# Altium PCB Urukul.PcbDoc (part 11 of 15)
Units mm, origin at the board's own origin, x right, y up, seen from the top; angles counter-clockwise.
Board outline 161.99 x 100 mm, 6 copper layers (L1, L2, L3, L4, P5, L6), stack 1.548 mm thick; 1078 components, 609 nets, 3798 pads, 2552 vias.
Unrouted connection lines stored in the file: 1.
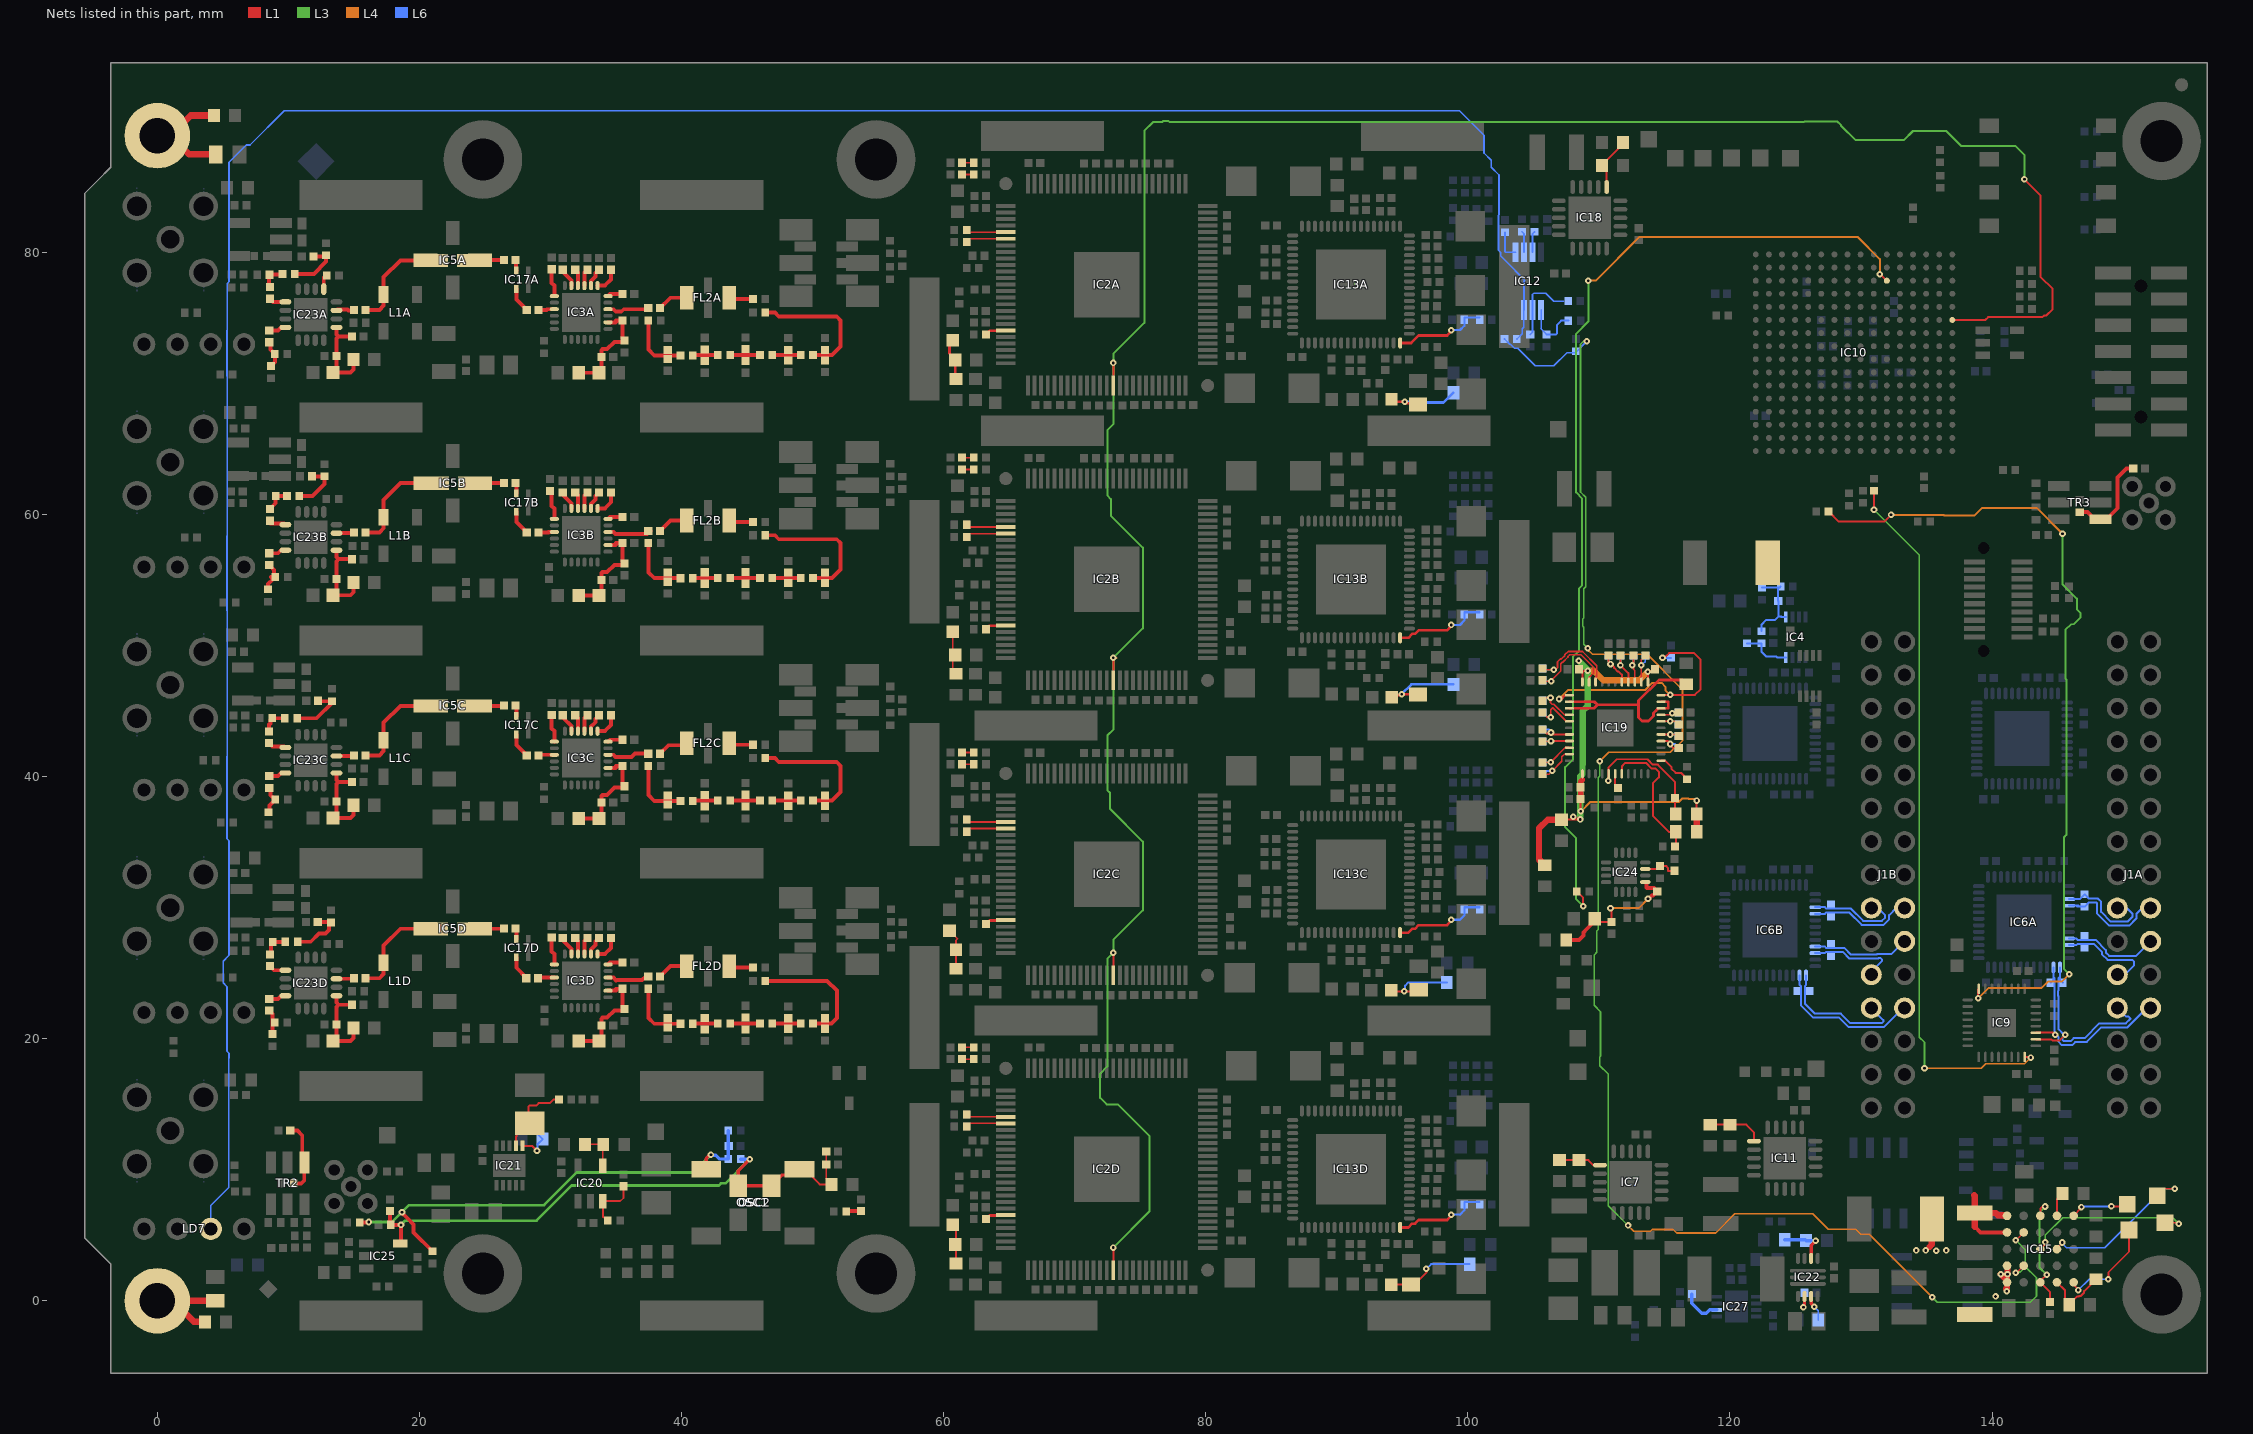
[diagram p13: the nets of this part, all layers, seen from the top]

## Via types
v1: diameter 0.5, hole 0.2, L1 to L6, tented both sides, 1964 vias
v2: diameter 0.5, hole 0.2, L1 to L6, 480 vias
v3: diameter 0.6, hole 0.3, L1 to L6, tented both sides, 52 vias
v4: diameter 0.6, hole 0.3, L1 to L6, 36 vias
v5: diameter 0.762, hole 0.508, L1 to L6, tented both sides, 20 vias

## Nets (pads, with @x,y where several pads share a name; then routed paths per layer and width w, separated by ;. In a path a pad name is that pad's centre, name@x,y a point inside that pad or via, vN(x,y) a via of type N, cw(c..) or ccw(c..) an arc to the next point about the centre after c; other vN are vias at no path point) (continued)
LVDS5A_N: IC6A.4 J1A.18 R21A.2 | length 8.5
  L6 w0.152: IC6A.4@145.881,30.146 146.608,30.146 146.538,30.076 ; 146.47,30.076 146.538,30.076 ; J1A.18@152.098,29.967 151.44,29.967 151.02,29.547 151.02,29.192 150.461,28.632 148.938,28.632 148.023,29.548 148.023,30.317 147.947,30.393 147.374,30.393 R21A.2@147.056,30.076 146.538,30.076
LVDS5A_P: IC6A.3 J1A.17 R21A.1 | length 8
  L6 w0.152: IC6A.3@145.881,30.646 146.686,30.646 R21A.1@147.056,31.016 147.374,30.698 148.073,30.698 148.328,30.443 148.328,29.674 149.064,28.937 150.334,28.937 150.715,29.318 150.715,29.547 150.296,29.967 J1A.17@149.558,29.967
LVDS5B_N: IC6B.4 J1B.18 R21B.2 | length 8
  L6 w0.152: IC6B.4@126.508,29.532 127.234,29.532 127.332,29.63 127.708,29.63 129.098,29.63 130.043,28.685 131.724,28.685 132.153,29.113 132.153,29.435 132.71,29.992 J1B.18@133.328,29.992
LVDS5B_P: IC6B.3 J1B.17 R21B.1 | length 7.4
  L6 w0.152: IC6B.3@126.508,30.032 127.234,30.032 127.332,29.934 127.708,29.934 129.224,29.934 130.169,28.989 131.598,28.989 131.848,29.239 131.848,29.435 131.29,29.992 J1B.17@130.788,29.992
LVDS6A_N: IC6A.10 J1A.21 R24A.2 | length 7.5
  L6 w0.152: IC6A.10@145.881,27.146 146.434,27.146 146.532,27.243 147.056,27.243 147.769,27.243 148.379,26.634 148.379,26.449 148.811,26.016 150.691,26.016 150.843,25.865 150.843,25.611 150.119,24.887 J1A.21@149.558,24.887
LVDS6A_P: IC6A.9 J1A.20 R24A.1 | length 7.3
  L6 w0.152: IC6A.9@145.881,27.646 146.42,27.646 146.518,27.548 147.056,27.548 147.895,27.548 148.683,26.76 148.683,26.575 148.937,26.321 150.993,26.321 J1A.20@152.098,27.427
LVDS6B_N: IC6B.10 J1B.21 R24B.2 | length 6.9
  L6 w0.152: IC6B.10@126.508,26.532 127.234,26.532 127.332,26.63 127.708,26.63 128.594,26.63 129.105,26.118 131.33,26.118 131.353,26.142 131.5,26.142 131.589,26.052 131.589,25.926 130.788,25.125 J1B.21@130.788,24.912
LVDS6B_P: IC6B.9 J1B.20 R24B.1 | length 7.5
  L6 w0.152: IC6B.9@126.508,27.032 127.234,27.032 127.332,26.934 127.708,26.934 128.72,26.934 129.231,26.423 131.203,26.423 131.227,26.446 132.322,26.446 J1B.20@133.328,27.452
LVDS7A_N: IC6A.14 IC9.11 J1A.24 R35A.2 | length 16.1
  L1 w0.152: IC9.11@143.341,20.455 144.665,20.455 v1(144.821,20.298)
  L6 w0.152: R35A.2@144.461,24.271 144.681,24.491 144.681,24.72 ; IC6A.14@144.681,25.446 144.681,24.72 ; v1@144.779,20.41 144.779,23.144 144.762,23.161 144.762,23.768 144.779,23.785 144.779,24.622 144.681,24.72 ; v1@144.856,20.333 145.052,20.137 145.052,19.795 145.332,19.515 146.118,19.515 146.346,19.744 147.205,19.744 147.294,19.833 148.321,20.86 150.334,20.86 151.82,22.347 J1A.24@152.098,22.347
LVDS7A_P: IC6A.13 IC9.10 J1A.23 R35A.1 | length 16
  L1 w0.152: IC9.10@143.341,19.955 144.524,19.955 144.634,19.845 145.118,19.845 v1(145.571,20.298)
  L6 w0.152: IC6A.13@145.181,25.446 145.181,24.72 ; R35A.1@145.401,24.271 145.181,24.491 145.181,24.72 ; v1@145.433,20.175 145.356,20.099 145.356,19.921 145.458,19.82 145.991,19.82 146.22,20.048 147.079,20.048 148.195,21.165 150.207,21.165 150.563,21.52 150.386,21.697 150.208,21.697 J1A.23@149.558,22.347 ; v1@145.489,20.308 145.084,20.713 145.084,23.234 145.041,23.276 145.041,23.652 145.084,23.695 145.084,24.622 145.181,24.72
LVDS7B_N: IC6B.14 J1B.24 R35B.2 | length 11.5
  L6 w0.152: IC6B.14@125.308,24.832 125.308,24.106 125.405,24.008 125.405,23.627 125.405,22.558 126.362,21.601 128.334,21.601 129.055,20.88 131.724,20.88 133.216,22.372 J1B.24@133.328,22.372
LVDS7B_P: IC6B.13 J1B.23 R35B.1 | length 10.3
  L6 w0.152: IC6B.13@125.808,24.832 125.808,24.106 125.71,24.008 125.71,23.627 125.71,22.685 126.489,21.906 128.46,21.906 129.182,21.185 131.598,21.185 131.71,21.297 131.71,21.424 J1B.23@130.788,22.346
MASTER_RESET: IC2A.14 IC2B.14 IC2C.14 IC2D.14 IC10.F16 | length 191.3
  L1 w0.152: IC2D.14@72.944,2.341 v1(72.944,4.063) ; IC2C.14@72.944,24.841 v1(72.944,26.563) ; IC2B.14@72.944,47.341 v1(72.944,49.063) ; IC2A.14@72.944,69.841 v1(72.944,71.563) ; IC10.F16@136.97,74.841 139.48,74.841 139.695,75.056 143.839,75.056 143.967,75.183 144.145,75.183 144.619,75.657 144.619,77.21 143.714,78.115 143.714,84.325 v1(142.472,85.567)
  L3 w0.152: v1(72.944,4.063) 75.694,6.813 75.694,12.588 73.293,14.988 72.439,14.988 71.939,15.488 71.939,16.467 71.944,16.472 71.944,17.335 72.491,17.882 72.491,26.11 v1(72.944,26.563) 72.944,27.541 75.194,29.791 75.194,35.041 72.695,37.54 72.695,38.756 72.498,38.953 72.498,43.133 72.944,43.579 v1(72.944,49.063) 75.194,51.313 75.194,57.476 72.767,59.903 72.767,61.177 72.491,61.453 72.491,66.443 72.944,66.896 v1(72.944,71.563) 72.944,72.25 75.314,74.62 75.314,89.276 75.975,89.936 76.672,89.936 76.774,90.038 77.149,90.038 77.251,89.936 78.134,89.936 78.159,89.961 125.668,89.961 125.693,89.987 128.203,89.987 128.469,89.722 128.469,89.682 129.587,88.563 133.269,88.563 133.969,89.263 136.519,89.263 137.669,88.113 141.794,88.113 142.472,87.435 v1(142.472,85.567)
  L4 w0.152: v1(72.944,49.063) v1@73.176,49.063
MMCX_OSCn_SEL: IC10.C11 R165.1 | length 77
  L1 w0.127: v1@131.411,78.341 131.457,78.341 131.957,77.841 IC10.C11@131.97,77.841
  L1 w0.152: R165.1@108.321,31.241 108.794,30.769 v1(108.794,30.119)
  L3 w0.152: v1(108.794,30.119) 108.258,30.655 108.258,35.3 107.42,36.138 107.42,40.725 108.029,41.334 108.029,47.846 108.005,47.871 108.005,49.131 108.491,49.616 108.491,54.366 108.724,54.6 108.724,61.214 108.258,61.68 108.258,73.787 109.198,74.727 v1(109.198,77.846)
  L4 w0.152: v1(109.198,77.846) 109.749,77.846 113.077,81.173 129.76,81.173 131.444,79.489 v1(131.444,78.341)
NetB1_1: B1.1 C113.1 R159.2 | length 8.9
  L1 w0.5: B1.1@0,88.9 0.999,88.9 2.543,90.444 R159.2@4.334,90.444 ; B1.1@1.398,88.9 1.398,88.516 2.442,87.472 C113.1@4.463,87.472
NetB2_1: B2.1 C121.1 R161.2 | length 8.7
  L1 w0.5: R161.2@3.648,-1.606 2.797,-1.606 1.192,0 B2.1@0,0 0.009,0.009 C121.1@4.423,0.009
NetC1_2: C1.2 IC4.1 R32.1 R36.1 R39.2 | length 6.4
  L6 w0.152: R32.1@122.408,51.102 122.408,51.592 122.783,51.967 123.443,51.967 123.708,52.232 ; R36.1@122.458,54.427 R39.2@123.783,54.427 ; R39.2@123.863,54.507 R39.2@123.783,54.427 ; IC4.1@124.258,52.182 123.908,52.182 123.908,52.207 123.933,52.232 123.708,52.232 ; 123.708,52.232 123.708,53.382 C1.2@123.683,53.407 123.683,54.327 R39.2@123.783,54.427
NetC14A_2: C14A.2 IC3A.6 | length 1.2
  L1 w0.3: IC3A.6@34.394,76.663 34.544,76.813 C14A.2@35.494,76.813
NetC14B_2: C14B.2 IC3B.6 | length 1.2
  L1 w0.3: IC3B.6@34.394,59.663 34.544,59.813 C14B.2@35.494,59.813
NetC14C_2: C14C.2 IC3C.6 | length 1.2
  L1 w0.3: IC3C.6@34.394,42.663 34.544,42.813 C14C.2@35.494,42.813
NetC14D_2: C14D.2 IC3D.6 | length 1.2
  L1 w0.3: IC3D.6@34.394,25.663 34.544,25.813 C14D.2@35.494,25.813
NetC15A_2: C15A.2 IC3A.7 | length 2
  L1 w0.3: IC3A.7@33.594,77.463 34.144,77.463 34.615,77.935 C15A.2@34.615,78.678
NetC15B_2: C15B.2 IC3B.7 | length 2
  L1 w0.3: IC3B.7@33.594,60.463 34.144,60.463 34.615,60.935 C15B.2@34.615,61.678
NetC15C_2: C15C.2 IC3C.7 | length 2
  L1 w0.3: IC3C.7@33.594,43.463 34.144,43.463 34.615,43.935 C15C.2@34.615,44.678
NetC15D_2: C15D.2 IC3D.7 | length 2
  L1 w0.3: IC3D.7@33.594,26.463 34.144,26.463 34.615,26.935 C15D.2@34.615,27.678
NetC16A_2: C16A.2 IC3A.8 | length 1.5
  L1 w0.3: IC3A.8@33.094,77.463 33.094,77.813 33.427,78.147 33.427,78.413 33.692,78.678 C16A.2@33.715,78.678
NetC16B_2: C16B.2 IC3B.8 | length 1.5
  L1 w0.3: IC3B.8@33.094,60.463 33.094,60.813 33.427,61.147 33.427,61.413 33.692,61.678 C16B.2@33.715,61.678
NetC16C_2: C16C.2 IC3C.8 | length 1.5
  L1 w0.3: IC3C.8@33.094,43.463 33.094,43.813 33.427,44.147 33.427,44.413 33.692,44.678 C16C.2@33.715,44.678
NetC16D_2: C16D.2 IC3D.8 | length 1.5
  L1 w0.3: IC3D.8@33.094,26.463 33.094,26.813 33.427,27.147 33.427,27.413 33.692,27.678 C16D.2@33.715,27.678
NetC17A_2: C17A.2 IC3A.9 | length 1.3
  L1 w0.3: IC3A.9@32.594,77.463 32.594,78.456 C17A.2@32.815,78.678
NetC17B_2: C17B.2 IC3B.9 | length 1.3
  L1 w0.3: IC3B.9@32.594,60.463 32.594,61.456 C17B.2@32.815,61.678
NetC17C_2: C17C.2 IC3C.9 | length 1.3
  L1 w0.3: IC3C.9@32.594,43.463 32.594,44.456 C17C.2@32.815,44.678
NetC17D_2: C17D.2 IC3D.9 | length 1.3
  L1 w0.3: IC3D.9@32.594,26.463 32.594,27.456 C17D.2@32.815,27.678
NetC18A_2: C18A.2 IC3A.10 | length 1.3
  L1 w0.3: C18A.2@31.89,78.678 32.094,78.474 IC3A.10@32.094,77.463
NetC18B_2: C18B.2 IC3B.10 | length 1.3
  L1 w0.3: C18B.2@31.89,61.678 32.094,61.474 IC3B.10@32.094,60.463
NetC18C_2: C18C.2 IC3C.10 | length 1.3
  L1 w0.3: C18C.2@31.89,44.678 32.094,44.474 IC3C.10@32.094,43.463
NetC18D_2: C18D.2 IC3D.10 | length 1.3
  L1 w0.3: C18D.2@31.89,27.678 32.094,27.474 IC3D.10@32.094,26.463
NetC19A_2: C19A.2 IC3A.11 | length 1.5
  L1 w0.3: C19A.2@30.94,78.678 30.94,78.49 30.948,78.49 31.594,77.844 IC3A.11@31.594,77.463
NetC19B_2: C19B.2 IC3B.11 | length 1.5
  L1 w0.3: C19B.2@30.94,61.678 30.94,61.49 30.948,61.49 31.594,60.844 IC3B.11@31.594,60.463
NetC19C_2: C19C.2 IC3C.11 | length 1.5
  L1 w0.3: C19C.2@30.94,44.678 30.94,44.49 30.948,44.49 31.594,43.844 IC3C.11@31.594,43.463
NetC19D_2: C19D.2 IC3D.11 | length 1.5
  L1 w0.3: C19D.2@30.94,27.678 30.94,27.49 30.948,27.49 31.594,26.844 IC3D.11@31.594,26.463
NetC20A_2: C20A.2 IC3A.13 | length 2.1
  L1 w0.3: C20A.2@30.094,78.713 30.094,77.663 30.294,77.463 IC3A.13@30.294,76.663
NetC20B_2: C20B.2 IC3B.13 | length 2.1
  L1 w0.3: C20B.2@30.094,61.713 30.094,60.663 30.294,60.463 IC3B.13@30.294,59.663
NetC20C_2: C20C.2 IC3C.13 | length 2.1
  L1 w0.3: C20C.2@30.094,44.713 30.094,43.663 30.294,43.463 IC3C.13@30.294,42.663
NetC20D_2: C20D.2 IC3D.13 | length 2.1
  L1 w0.3: C20D.2@30.094,27.713 30.094,26.663 30.294,26.463 IC3D.13@30.294,25.663
NetC21A_2: C21A.2 C22A.2 C23A.2 C24A.2 IC3A.2 L7A.2 | length 8.2
  L1 w0.3: L7A.2@32.144,70.813 C21A.2@33.694,70.813 33.894,71.013 C23A.2@33.894,72.013 33.894,72.523 33.982,72.611 34.322,72.611 34.873,73.161 35.542,73.161 C22A.2@35.644,73.263 35.494,73.413 C24A.2@35.494,74.813 34.984,74.813 34.984,74.691 34.956,74.663 IC3A.2@34.394,74.663
NetC21B_2: C21B.2 C22B.2 C23B.2 C24B.2 IC3B.2 L7B.2 | length 8.2
  L1 w0.3: L7B.2@32.144,53.813 C21B.2@33.694,53.813 33.894,54.013 C23B.2@33.894,55.013 33.894,55.523 33.982,55.611 34.322,55.611 34.873,56.161 35.542,56.161 C22B.2@35.644,56.263 35.494,56.413 C24B.2@35.494,57.813 34.984,57.813 34.984,57.691 34.956,57.663 IC3B.2@34.394,57.663
NetC21C_2: C21C.2 C22C.2 C23C.2 C24C.2 IC3C.2 L7C.2 | length 8.2
  L1 w0.3: L7C.2@32.144,36.813 C21C.2@33.694,36.813 33.894,37.013 C23C.2@33.894,38.013 33.894,38.523 33.982,38.611 34.322,38.611 34.873,39.161 35.542,39.161 C22C.2@35.644,39.263 35.494,39.413 C24C.2@35.494,40.813 34.984,40.813 34.984,40.691 34.956,40.663 IC3C.2@34.394,40.663
NetC21D_2: C21D.2 C22D.2 C23D.2 C24D.2 IC3D.2 L7D.2 | length 8.2
  L1 w0.3: L7D.2@32.144,19.813 C21D.2@33.694,19.813 33.894,20.013 C23D.2@33.894,21.013 33.894,21.523 33.982,21.611 34.322,21.611 34.873,22.161 35.542,22.161 C22D.2@35.644,22.263 35.494,22.413 C24D.2@35.494,23.813 34.984,23.813 34.984,23.691 34.956,23.663 IC3D.2@34.394,23.663
NetC26A_2: C26A.2 R41A.1 | length 0.9
  L1 w0.127: C26A.2@61.414,86.838 R41A.1@62.294,86.838
NetC26B_2: C26B.2 R41B.1 | length 0.9
  L1 w0.127: C26B.2@61.414,64.338 R41B.1@62.294,64.338
NetC26C_2: C26C.2 R41C.1 | length 0.9
  L1 w0.127: C26C.2@61.414,41.838 R41C.1@62.294,41.838
NetC26D_2: C26D.2 R41D.1 | length 0.9
  L1 w0.127: C26D.2@61.414,19.338 R41D.1@62.294,19.338
NetC28A_1: C28A.1 FL2A.3 | length 2.4
  L1 w0.298: C28A.1@38.364,75.747 39.155,76.538 FL2A.3@40.394,76.538
NetC28A_2: C28A.2 IC3A.4 | length 3.3
  L1 w0.298: IC3A.4@34.394,75.663 34.801,75.663 34.991,75.473 35.402,75.473 35.592,75.663 37.309,75.663 C28A.2@37.393,75.747 ; C28A.2@37.414,75.768 C28A.2@37.393,75.747 ; C28A.2@37.464,75.747 C28A.2@37.393,75.747
NetC28B_1: C28B.1 FL2B.3 | length 2.4
  L1 w0.298: C28B.1@38.364,58.747 39.155,59.538 FL2B.3@40.394,59.538
NetC28B_2: C28B.2 IC3B.4 | length 3.4
  L1 w0.298: IC3B.4@34.394,58.663 34.801,58.663 34.959,58.506 37.373,58.506 37.539,58.672 C28B.2@37.617,58.75
NetC28C_1: C28C.1 FL2C.3 | length 2.4
  L1 w0.298: C28C.1@38.364,41.747 39.005,42.388 40.244,42.388 FL2C.3@40.394,42.538
NetC28C_2: C28C.2 IC3C.4 | length 3.2
  L1 w0.298: IC3C.4@34.468,41.663 34.801,41.663 34.969,41.495 36.187,41.495 36.439,41.747 C28C.2@37.464,41.747
NetC28D_1: C28D.1 FL2D.3 | length 2.4
  L1 w0.298: C28D.1@38.364,24.747 39.155,25.538 FL2D.3@40.394,25.538
NetC28D_2: C28D.2 IC3D.4 | length 3.3
  L1 w0.298: IC3D.4@34.394,24.663 34.801,24.663 35.015,24.449 35.039,24.473 36.995,24.473 C28D.2@37.269,24.747 ; C28D.2@37.287,24.765 C28D.2@37.269,24.747 ; C28D.2@37.464,24.747 C28D.2@37.269,24.747
NetC29A_1: C29A.1 IC5A.3 L1A.3 R178A.2 | length 7.4
  L1 w0.298: C29A.1@15.894,75.613 16.94,75.613 17.274,75.947 L1A.3@17.274,76.782 17.274,78.118 18.544,79.388 IC5A.3@20.459,79.388
NetC29A_2: C29A.2 IC23A.3 | length 1.4
  L1 w0.298: IC23A.3@13.673,75.574 13.739,75.64 14.512,75.64 14.578,75.574 14.954,75.574 C29A.2@14.994,75.613
NetC29B_1: C29B.1 IC5B.3 L1B.3 R178B.2 | length 7.4
  L1 w0.298: C29B.1@15.894,58.613 16.94,58.613 17.274,58.947 L1B.3@17.274,59.782 17.274,61.118 18.544,62.388 IC5B.3@20.459,62.388
NetC29B_2: C29B.2 IC23B.3 | length 1.3
  L1 w0.298: IC23B.3@13.673,58.574 14.954,58.574 C29B.2@14.994,58.613
NetC29C_1: C29C.1 IC5C.3 L1C.3 R178C.2 | length 7.4
  L1 w0.298: C29C.1@15.894,41.613 16.94,41.613 17.274,41.947 L1C.3@17.274,42.782 17.274,44.118 18.544,45.388 IC5C.3@20.459,45.388
NetC29C_2: C29C.2 IC23C.3 | length 1.3
  L1 w0.298: IC23C.3@13.673,41.574 14.954,41.574 C29C.2@14.994,41.613
NetC29D_1: C29D.1 IC5D.3 L1D.3 R178D.2 | length 7.4
  L1 w0.298: C29D.1@15.894,24.613 16.94,24.613 17.274,24.947 L1D.3@17.274,25.782 17.274,27.118 18.544,28.388 IC5D.3@20.459,28.388
NetC29D_2: C29D.2 IC23D.3 | length 1.3
  L1 w0.298: IC23D.3@13.673,24.574 14.954,24.574 C29D.2@14.994,24.613
NetC36A_1: C36A.1 IC3A.15 | length 1.2
  L1 w0.298: C36A.1@29.094,75.613 29.682,75.613 29.732,75.663 30.074,75.663 IC3A.15@30.294,75.663
NetC36A_2: C36A.2 IC17A.2 | length 1.9
  L1 w0.298: IC17A.2@27.394,77.213 27.394,76.413 C36A.2@28.194,75.613
NetC36B_1: C36B.1 IC3B.15 | length 1.3
  L1 w0.298: C36B.1@29.094,58.613 29.837,58.613 29.837,58.663 IC3B.15@30.294,58.663 IC3B.15@30.302,58.663
NetC36B_2: C36B.2 IC17B.2 | length 1.9
  L1 w0.298: IC17B.2@27.394,60.213 27.394,59.413 C36B.2@28.194,58.613
NetC36C_1: C36C.1 IC3C.15 | length 1.1
  L1 w0.298: C36C.1@29.235,41.631 29.268,41.663 IC3C.15@30.294,41.663
NetC36C_2: C36C.2 IC17C.2 | length 1.9
  L1 w0.298: IC17C.2@27.394,43.213 27.394,42.413 C36C.2@28.194,41.613
NetC36D_1: C36D.1 IC3D.15 | length 1.6
  L1 w0.298: C36D.1@29.05,24.613 29.101,24.663 IC3D.15@30.294,24.663 IC3D.15@29.947,24.663
NetC36D_2: C36D.2 IC17D.2 | length 1.9
  L1 w0.298: IC17D.2@27.394,26.213 27.394,25.413 28.172,24.635 C36D.2@28.194,24.613
NetC38A_1: C38A.1 C39A.2 C40A.2 IC23A.1 L6A.1 | length 7.2
  L1 w0.3: IC23A.1@13.673,74.274 13.673,73.749 13.833,73.588 ; C38A.1@14.844,73.588 13.833,73.588 ; L6A.1@14.969,71.813 14.969,71.063 14.744,70.838 C39A.2@13.394,70.838 13.619,71.063 13.669,71.013 C40A.2@13.669,72.088 13.669,73.424 13.833,73.588
NetC38B_1: C38B.1 C39B.2 C40B.2 IC23B.1 L6B.1 | length 7.2
  L1 w0.3: IC23B.1@13.673,57.274 13.673,56.749 13.833,56.588 ; C38B.1@14.844,56.588 13.833,56.588 ; L6B.1@14.969,54.813 14.969,54.063 14.744,53.838 C39B.2@13.394,53.838 13.619,54.063 13.669,54.013 C40B.2@13.669,55.088 13.669,56.424 13.833,56.588
NetC38C_1: C38C.1 C39C.2 C40C.2 IC23C.1 L6C.1 | length 7.2
  L1 w0.3: IC23C.1@13.673,40.274 13.673,39.749 13.833,39.588 ; C38C.1@14.844,39.588 13.833,39.588 ; L6C.1@14.969,37.813 14.969,37.063 14.744,36.838 C39C.2@13.394,36.838 13.619,37.063 13.669,37.013 C40C.2@13.669,38.088 13.669,39.424 13.833,39.588
NetC38D_1: C38D.1 C39D.2 C40D.2 IC23D.1 L6D.1 | length 7.2
  L1 w0.3: IC23D.1@13.673,23.274 13.673,22.749 13.833,22.588 ; C38D.1@14.844,22.588 13.833,22.588 ; L6D.1@14.969,20.813 14.969,20.063 14.744,19.838 C39D.2@13.394,19.838 13.619,20.063 13.669,20.013 C40D.2@13.669,21.088 13.669,22.424 13.833,22.588
NetC44A_2: C44A.2 C107A.2 R113A.1 | length 5.5
  L1 w0.203: C44A.2@94.494,68.552 94.537,68.595 v1(95.194,68.595) ; v1@95.194,68.541 95.244,68.491 C107A.2@95.944,68.491
  L6 w0.203: v1(95.194,68.595) 95.205,68.606 96.677,68.606 96.742,68.541 98.144,68.541 R113A.1@98.894,69.291
NetC44B_2: C44B.2 C107B.2 R113B.1 | length 6.1
  L1 w0.203: C44B.2@94.194,46.213 94.869,46.213 94.944,46.288 v1(94.944,46.291) 95.894,46.291 C107B.2@95.944,46.241
  L6 w0.203: v1(94.944,46.291) 95.694,47.041 R113B.1@98.894,47.041
NetC44C_2: C44C.2 C107C.2 R113C.1 | length 5.6
  L1 w0.152: C44C.2@94.194,23.713 94.294,23.613 95.816,23.613 C107C.2@95.944,23.741
  L6 w0.152: v1(95.143,23.613) 95.21,23.68 95.21,24.057 95.444,24.291 R113C.1@98.394,24.291
NetC44D_2: C44D.2 C107D.2 R113D.1 | length 6.9
  L1 w0.152: C44D.2@94.194,1.213 94.222,1.241 95.66,1.241 C107D.2@95.944,1.241 ; C107D.2@95.694,1.491 96.18,1.491 96.84,2.151 v1(96.84,2.437)
  L6 w0.152: v1(96.84,2.437) 97.194,2.791 R113D.1@100.144,2.791
NetC47A_1: C47A.1 IC23A.12 | length 1.3
  L1 w0.298: C47A.1@8.544,74.038 9.194,74.038 9.43,74.274 IC23A.12@9.773,74.274
NetC47A_2: C47A.2 R18A.2 R19A.2 | length 2.1
  L1 w0.298: C47A.2@8.544,73.138 8.637,73.045 8.637,72.575 8.814,72.398 8.834,72.398 8.974,72.258 R19A.2@8.974,72.238 8.974,71.628 R18A.2@8.674,71.328
NetC47B_1: C47B.1 IC23B.12 | length 1.3
  L1 w0.298: C47B.1@8.544,57.038 9.194,57.038 9.43,57.274 IC23B.12@9.773,57.274
NetC47B_2: C47B.2 R18B.2 R19B.2 | length 2.4
  L1 w0.298: R18B.2@8.451,54.283 8.451,54.685 8.844,55.078 8.864,55.078 R19B.2@9.004,55.218 ; C47B.2@8.544,56.138 8.674,56.008 8.906,55.777 8.906,55.337 R19B.2@9.004,55.238 ; 8.674,55.238 R19B.2@8.814,55.238
NetC47C_1: C47C.1 IC23C.12 | length 1.3
  L1 w0.298: C47C.1@8.544,40.038 9.194,40.038 9.43,40.274 IC23C.12@9.773,40.274
NetC47C_2: C47C.2 R18C.2 R19C.2 | length 2.1
  L1 w0.298: R18C.2@8.471,37.283 8.573,37.385 8.573,37.807 R19C.2@9.004,38.238 ; C47C.2@8.544,39.138 8.636,39.046 8.636,38.574 8.812,38.398 R19C.2@8.864,38.398
NetC47D_1: C47D.1 IC23D.12 | length 1.3
  L1 w0.298: C47D.1@8.544,23.038 9.194,23.038 9.43,23.274 IC23D.12@9.773,23.274
NetC47D_2: C47D.2 R18D.2 R19D.2 | length 1.9
  L1 w0.298: C47D.2@8.544,22.138 8.785,21.897 R18D.2@8.785,20.358 ; R19D.2@8.974,21.163 R19D.2@9.004,21.163
NetC49A_1: C49A.1 IC23A.9 | length 1.3
  L1 w0.298: C49A.1@8.585,76.461 8.823,76.224 IC23A.9@9.773,76.224
NetC49A_2: C49A.2 R2A.1 R3A.2 | length 1.9
  L1 w0.298: C49A.2@8.509,77.437 R3A.2@8.509,78.334 ; R3A.2@8.564,78.297 9.487,78.297 R2A.1@9.549,78.359
NetC49B_1: C49B.1 IC23B.9 | length 1.2
  L1 w0.298: C49B.1@8.619,59.308 9.688,59.308 IC23B.9@9.773,59.224
NetC49B_2: C49B.2 R2B.1 R3B.2 | length 2.1
  L1 w0.298: C49B.2@8.585,60.419 9.025,60.859 R3B.2@9.025,61.413 R2B.1@9.899,61.413
NetC49C_1: C49C.1 IC23C.9 | length 1.4
  L1 w0.298: C49C.1@8.534,42.552 8.778,42.308 9.688,42.308 IC23C.9@9.773,42.224
NetC49C_2: C49C.2 R2C.1 R3C.2 | length 2.1
  L1 w0.298: C49C.2@8.534,43.452 8.534,43.962 8.629,44.057 8.629,44.327 R3C.2@8.759,44.456 8.767,44.448 R2C.1@9.724,44.448
NetC49D_1: C49D.1 IC23D.9 | length 1.3
  L1 w0.298: C49D.1@8.585,25.534 8.896,25.224 IC23D.9@9.773,25.224
NetC49D_2: C49D.2 R2D.1 R3D.2 | length 2
  L1 w0.298: C49D.2@8.585,26.434 8.69,26.539 8.69,27.276 R3D.2@8.795,27.381 9.759,27.381 R2D.1@9.774,27.396
NetC50A_1: C50A.1 R2A.2 R4A.2 R192A.1 | length 4.3
  L1 w0.298: R2A.2@10.489,78.359 11.945,78.359 12.881,79.294 R4A.2@12.881,79.768 12.793,79.68 C50A.1@11.919,79.68
NetC50B_1: C50B.1 R2B.2 R4B.2 R192B.1 | length 3.8
  L1 w0.298: R2B.2@10.839,61.413 11.843,61.413 12.744,62.315 R4B.2@12.744,62.903 12.739,62.908 R192B.1@11.809,62.908
NetC50C_1: C50C.1 R2C.2 R4C.2 R192C.1 | length 4.3
  L1 w0.298: R2C.2@10.664,44.448 12.148,44.448 13.323,45.623 R4C.2@13.323,45.748 12.309,45.748 C50C.1@12.269,45.788
NetC50D_1: C50D.1 R2D.2 R4D.2 R192D.1 | length 4.3
  L1 w0.298: R2D.2@10.714,27.396 11.705,27.396 12.322,28.013 12.823,28.013 13.094,28.285 13.094,28.791 13.171,28.868 13.126,28.913 C50D.1@12.244,28.913
NetC55A_1: C55A.1 IC17A.1 | length 0.8
  L1 w0.298: C55A.1@27.344,79.413 27.369,79.388 27.369,78.638 IC17A.1@27.394,78.613
NetC55A_2: C55A.2 IC5A.1 R178A.1 | length 1.8
  L1 w0.298: IC5A.1@24.629,79.388 24.654,79.413 C55A.2@26.444,79.413
NetC55B_1: C55B.1 IC17B.1 | length 0.8
  L1 w0.298: C55B.1@27.344,62.413 27.394,62.363 IC17B.1@27.394,61.613
NetC55B_2: C55B.2 IC5B.1 R178B.1 | length 1.8
  L1 w0.298: IC5B.1@24.629,62.388 24.654,62.413 C55B.2@26.444,62.413
NetC55C_1: C55C.1 IC17C.1 | length 0.8
  L1 w0.298: C55C.1@27.344,45.413 27.394,45.363 IC17C.1@27.394,44.613
NetC55C_2: C55C.2 IC5C.1 R178C.1 | length 2
  L1 w0.298: IC5C.1@24.629,45.388 C55C.2@26.419,45.388 ; C55C.2@26.444,45.413 C55C.2@26.419,45.388 ; C55C.2@26.544,45.388 26.444,45.388 C55C.2@26.419,45.388
NetC55D_1: C55D.1 IC17D.1 | length 0.8
  L1 w0.298: C55D.1@27.344,28.413 27.394,28.363 IC17D.1@27.394,27.613
NetC55D_2: C55D.2 IC5D.1 R178D.1 | length 1.8
  L1 w0.298: IC5D.1@24.629,28.388 26.419,28.388 C55D.2@26.444,28.413
NetC56_2: C56.2 IC19.38 R34.2 | length 3
  L1 w0.152: v1@110.744,48.728 C56.2@110.744,49.238 ; v1(110.884,48.588) 110.927,48.588 111.166,48.349 111.166,48.29 111.446,48.01 111.505,48.01 111.744,47.771 IC19.38@111.744,47.213
  L6 w0.152: R34.2@110.744,49.218 110.744,48.728 v1(110.884,48.588)
NetC57_2: C57.2 IC19.10 R42.2 | length 3.7
  L1 w0.127: C57.2@105.694,40.188 106.186,40.188 v1(106.429,40.431) 107.166,41.168 107.166,41.51 107.369,41.713 IC19.10@107.744,41.713
  L6 w0.127: R42.2@105.714,40.188 105.957,40.431 v1(106.429,40.431)
NetC58_2: C58.2 IC19.9 R37.2 | length 3.1
  L1 w0.127: C58.2@105.694,41.088 v1(106.314,41.088) 107.439,42.213 IC19.9@107.744,42.213
  L6 w0.127: R37.2@105.714,41.088 v1(106.314,41.088)
NetC59_2: C59.2 IC19.8 R60.2 | length 2.7
  L1 w0.127: C59.2@105.694,42.688 106.319,42.688 v1(106.344,42.713) IC19.8@107.744,42.713
  L6 w0.127: R60.2@105.714,42.688 106.319,42.688 v1(106.344,42.713)
NetC60_2: C60.2 IC19.7 R61.2 | length 3
  L1 w0.127: C60.2@105.694,43.588 105.994,43.288 106.044,43.288 ; v1@106.121,43.365 106.044,43.288 ; v1@106.204,43.288 106.044,43.288 ; v1@106.444,43.348 106.444,43.21 107.741,43.21 IC19.7@107.744,43.213
  L6 w0.127: R61.2@105.714,43.588 106.204,43.588 106.345,43.447 v1(106.345,43.365)
NetC61_2: C61.2 IC19.37 R70.2 | length 3
  L1 w0.152: C61.2@111.644,49.238 v1(111.644,48.488) 112.244,47.888 IC19.37@112.244,47.213
  L6 w0.152: v1(111.644,48.488) R70.2@111.644,49.218
NetC62_2: C62.2 IC19.5 R62.2 | length 4
  L1 w0.127: C62.2@105.694,44.888 106.041,44.541 v1(106.334,44.541) 106.334,45.095 106.483,45.244 107.514,44.213 IC19.5@107.744,44.213
  L6 w0.127: R62.2@105.714,44.888 106.061,44.541 v1(106.334,44.541)
NetC65_2: C65.2 IC19.36 R71.2 | length 2.8
  L1 w0.127: C65.2@112.644,49.238 112.644,48.488 112.644,48.188 112.744,48.088 IC19.36@112.744,47.213
  L6 w0.127: v1(112.544,48.488) 112.644,48.588 R71.2@112.644,49.218
NetC66_2: C66.2 IC19.35 R72.2 | length 3
  L1 w0.127: IC19.35@113.244,47.213 v1(113.244,48.488) 113.244,48.938 C66.2@113.544,49.238
  L6 w0.127: v1(113.244,48.488) 113.484,48.728 113.544,48.728 R72.2@113.544,49.218
NetC67_2: C67.2 IC15.A3 IC15.E3 | length 9.2
  L1 w0.152: IC15.A3@143.682,6.485 143.682,7.022 143.856,7.195 v1(144.042,7.195) ; v1(144.16,1.992) 143.682,1.515 IC15.E3@143.682,1.405 144.432,0.655 C67.2@144.432,-0.105
  L3 w0.152: v1(144.042,7.195) 143.618,6.771 143.618,2.534 v1(144.16,1.992)
NetC68_2: C68.2 IC19.30 R76.2 | length 2.4
  L1 w0.127: IC19.30@114.744,44.713 v1@115.444,44.713 ; v1(115.604,44.84) 115.571,44.84 v1@115.444,44.713 ; C68.2@116.094,44.888 115.919,44.713 115.604,44.713 v1@115.444,44.713
  L6 w0.127: v1(115.604,44.84) 115.492,44.84 115.444,44.888 115.604,44.888 R76.2@116.074,44.888
NetC71_2: C71.2 IC19.29 R95.2 | length 2.2
  L1 w0.127: IC19.29@114.744,44.213 v1(115.444,44.213) 115.869,44.213 C71.2@116.094,43.988
  L6 w0.127: v1(115.444,44.213) 115.869,44.213 116.074,44.008 R95.2@116.074,43.988
NetC72A_2: C72A.2 C99A.2 R92A.1 | length 2.9
  L1 w0.203: C99A.2@60.694,72.041 60.444,72.291 60.444,72.991 C72A.2@60.694,73.241 ; C99A.2@60.894,71.791 60.894,70.391 R92A.1@60.944,70.341
NetC72B_2: C72B.2 C99B.2 R92B.1 | length 3.3
  L1 w0.127: C72B.2@60.694,50.991 60.694,49.291 60.694,48.091 R92B.1@60.944,47.841
NetC72C_2: C72C.2 C99C.2 R92C.1 | length 3.2
  L1 w0.127: C99C.2@60.444,28.241 61.06,27.624 60.944,27.508 C72C.2@60.944,26.791 R92C.1@60.944,25.341
NetC72D_2: C72D.2 C99D.2 R92D.1 | length 3
  L1 w0.127: C72D.2@60.694,5.741 60.944,5.491 60.944,4.291 R92D.1@60.944,2.841
NetC73_2: C73.2 IC15.D1 IC15.E1 L2.1 | length 4.3
  L1 w0.483: 135.241,4.134 135.409,4.302 L2.1@135.409,6.24 ; v1(140.671,2.034) 140.899,1.806 141.142,1.806 IC15.E1@141.142,1.405 141.142,1.006 v1@141.067,0.931 ; IC15.D1@141.142,2.675 141.179,2.639 v1(141.179,2.034)
  other v1: 140.264,0.332 141.128,0.739 135.734,3.812 134.225,3.841 134.951,3.841 136.49,3.841
NetC87A_2: C87A.2 R40A.1 | length 0.9
  L1 w0.127: C87A.2@61.414,85.938 R40A.1@62.294,85.938
NetC87B_2: C87B.2 R40B.1 | length 0.9
  L1 w0.127: C87B.2@61.414,63.438 R40B.1@62.294,63.438
NetC87C_2: C87C.2 R40C.1 | length 0.9
  L1 w0.127: C87C.2@61.414,40.938 R40C.1@62.294,40.938
NetC87D_2: C87D.2 R40D.1 | length 0.9
  L1 w0.127: C87D.2@61.414,18.438 R40D.1@62.294,18.438
NetC88_2: C88.2 IC19.4 R63.2 | length 3.3
  L1 w0.127: C88.2@105.918,46.025 106.204,46.025 106.204,46.018 106.208,46.014 v1(106.307,46.014) 106.307,45.636 106.419,45.524 106.562,45.524 107.373,44.713 IC19.4@107.744,44.713
  L6 w0.127: R63.2@105.714,45.788 105.94,46.014 v1(106.307,46.014)
NetC91_2: C91.2 C97.2 C98.2 C100.2 IC19.12 IC19.34 IC19.44 L14.1 R103.1 R109.1 R151.2 | length 41.5
  L1 w0.127: v1(113.723,47.999) 114.105,47.999 C100.2@114.294,48.188 ; IC19.34@113.744,47.213 v1@113.744,47.771
  L1 w0.152: L14.1@107.137,36.715 108.292,36.715 v1@108.445,36.868 ; C98.2@108.494,48.188 C98.2@108.744,47.938 ; v1(108.603,37.369) C91.2@108.603,38.277 ; 108.744,39.751 IC19.12@108.744,40.213 ; IC19.44@108.744,47.213 C98.2@108.744,47.938 ; v1(109.144,48.082) 108.888,48.082 C98.2@108.744,47.938 ; v1(117.453,38.171) 117.453,37.157 R103.1@117.465,37.145
  L1 w0.406: C91.2@108.603,38.277 108.603,39.61 108.744,39.751
  L1 w0.483: R151.2@105.87,33.23 105.429,33.672 105.429,36.053 106.091,36.715 L14.1@107.137,36.715 ; R109.1@117.465,35.788 R103.1@117.465,37.145
  L3 w0.483: v1(108.458,48.844) 108.458,48.839 109.14,48.157 109.14,48.086 v1(109.144,48.082) 109.144,45.388 108.766,45.011 108.766,40.919 108.746,40.899 108.746,40.176 108.585,40.015 v1(108.585,36.728)
  L4 w0.152: v1(108.603,37.369) 108.657,37.369 109.35,38.061 116.08,38.061 116.339,38.319 116.828,38.319 116.852,38.295 117.33,38.295 v1(117.453,38.171)
  L4 w0.483: v1(109.144,48.082) 109.594,48.082 110.329,47.347 113.071,47.347 v1(113.723,47.999)
  other v1: 108.029,36.926
NetC92_2: C92.2 IC19.43 R69.2 | length 7.5
  L1 w0.127: C92.2@105.694,47.348 105.778,47.264 v1(106.369,47.264) 106.369,47.331 107.094,48.055 107.094,48.612 107.199,48.718 107.239,48.718 107.645,49.125 107.645,49.164 107.766,49.285 108.64,49.285 109.584,48.341 109.584,47.9 109.225,47.541 109.24,47.541 109.24,47.218 IC19.43@109.244,47.213
  L6 w0.127: R69.2@105.714,47.348 105.798,47.264 v1(106.369,47.264)
NetC93_2: C93.2 IC19.42 R77.2 | length 7.8
  L1 w0.127: C93.2@105.694,48.248 105.758,48.313 105.907,48.164 v1(106.569,48.164) 106.691,48.164 106.84,48.313 106.84,48.753 107.058,48.972 107.133,48.972 107.391,49.23 107.391,49.305 107.49,49.403 107.525,49.403 107.661,49.539 108.746,49.539 109.838,48.446 109.838,47.685 109.744,47.591 IC19.42@109.744,47.213
  L6 w0.127: R77.2@105.714,48.248 105.778,48.313 105.927,48.164 v1(106.569,48.164)
NetC94_2: C94.2 IC19.17 | length 1.2
  L1 w0.152: IC19.17@111.244,40.213 111.244,39.338 C94.2@111.444,39.138
NetC95_2: C95.2 IC19.27 R101.2 | length 2.1
  L1 w0.127: IC19.27@114.744,43.213 v1(115.444,43.213) 115.969,43.213 C95.2@116.094,43.088
  L6 w0.127: v1(115.444,43.213) 115.969,43.213 116.074,43.108 R101.2@116.074,43.088
NetC96_2: C96.2 IC19.26 R102.2 | length 2.5
  L1 w0.127: IC19.26@114.744,42.713 115.302,42.713 115.444,42.572 v1(115.444,42.488) ; v1@115.486,42.53 115.584,42.431 115.584,42.188 C96.2@116.094,42.188
  L6 w0.127: v1(115.444,42.488) 115.832,42.488 116.074,42.246 R102.2@116.074,42.188
NetC101_2: C101.2 C102.2 C212.1 IC25.5 L9.1 OSC1.4 OSC2.1 OSC2.4 R167.2 R188.1 | length 45.8
  L1 w0.127: C101.2@51.044,11.388 C102.2@51.044,10.388 51.044,9.288 L9.1@51.444,8.888
  L1 w0.152: OSC1.4@48.999,10.028 49.404,10.028 50.544,8.888 L9.1@51.444,8.888
  L1 w0.254: v1(45.191,10.797) 44.321,9.927 OSC2.1@44.321,8.788 OSC2.4@46.861,8.788 47.678,9.605 48.575,9.605 OSC1.4@48.999,10.028
  L1 w0.298: C212.1@17.744,6.838 17.744,5.869 R188.1@17.814,5.799 17.819,5.794 18.589,5.794 v1(18.594,5.788) 18.594,4.413 IC25.5@18.544,4.363
  L3 w0.211: v1(18.594,5.788) 18.919,6.113 28.935,6.113 31.61,8.788 42.844,8.788 43.019,8.963 43.357,8.963 v1(45.191,10.797)
  L6 w0.254: R167.2@44.504,10.824 44.522,10.806 45.182,10.806 v1(45.191,10.797)
NetC103_2: C103.2 R117.1 | length 1.2
  L1 w0.298: R117.1@52.556,6.812 52.585,6.841 C103.2@53.699,6.841
NetC122_1: C122.1 IC24.7 R162.2 | length 2.6
  L1 w0.152: IC24.7@113.543,32.946 114.413,32.946 114.633,33.166 115.143,33.166 115.266,33.043 115.266,32.813 C122.1@115.776,32.813
NetC123_2: C123.2 C131.2 IC24.5 L10.1 R164.2 | length 11.2
  L1 w0.152: L10.1@109.693,29.154 109.938,28.909 C123.2@110.965,28.909 110.965,29.885 v1(110.884,29.967)
  L1 w0.3: R164.2@107.509,27.528 108.494,27.528 108.836,27.87 108.836,28.102 108.918,28.185 108.918,28.232 109.693,29.007 L10.1@109.693,29.154 ; IC24.5@113.543,31.946 113.617,31.946 113.617,31.525 113.659,31.484 114.199,31.484 C131.2@114.456,31.227 114.143,30.914 114.031,30.914 113.869,30.752 113.869,30.678 v1(113.744,30.678)
  L4 w0.152: v1(110.884,29.967) 113.033,29.967 v1(113.744,30.678)
NetC139_1: C139.1 IC22.9 | length 2
  L1 w0.254: v1(125.609,-0.48) 125.609,-0.413 125.694,-0.328 IC22.9@125.694,0.341
  L6 w0.254: v1(125.609,-0.48) 125.656,-0.433 125.656,-0.259 125.691,-0.223 C139.1@125.691,0.61
NetC145_2: C145.2 OSC1.1 R167.1 R168.2 R187.1 R191.2 | length 37.8
  L1 w0.254: OSC1.1@41.889,10.028 41.889,10.863 42.167,11.141 v1(42.245,11.141)
  L1 w0.298: R191.2@15.439,5.963 15.463,5.987 16.095,5.987 v1(16.119,6.011) ; v1(18.669,6.763) 18.669,6.715 19.044,6.34 19.044,6.338 19.554,5.828 19.554,5.223 R187.1@20.994,3.783
  L3 w0.211: v1(16.119,6.011) 17.917,6.011 v1(18.669,6.763) 19.204,7.298 29.508,7.298 31.998,9.788 40.892,9.788 v1(42.245,11.141)
  L6 w0.254: v1(42.245,11.141) 42.275,11.111 42.6,11.111 42.887,10.824 R167.1@43.564,10.824 R168.2@43.564,12.999
NetC161_2: C161.2 IC15.A1 IC15.B1 L3.1 | length 7.6
  L1 w0.3: 138.682,5.649 139.115,5.215 IC15.B1@141.142,5.215
  L1 w0.483: 138.639,8.054 138.682,8.011 C161.2@138.682,6.695 ; 138.682,5.649 C161.2@138.682,6.695 ; IC15.A1@141.142,6.485 140.899,6.485 140.855,6.53 140.442,6.53 140.277,6.695 C161.2@138.682,6.695
NetC164A_1: C164A.1 C203A.2 R48A.1 R57A.1 | length 10.4
  L1 w0.298: R57A.1@46.39,75.415 47.117,75.415 47.419,75.113 51.844,75.113 52.144,74.813 52.144,72.813 51.494,72.163 50.944,72.163 R48A.1@50.031,72.163
NetC164B_1: C164B.1 C203B.2 R48B.1 R57B.1 | length 10.4
  L1 w0.298: R57B.1@46.39,58.415 47.117,58.415 47.419,58.113 51.844,58.113 52.144,57.813 52.144,55.813 51.494,55.163 50.944,55.163 R48B.1@50.031,55.163
NetC164C_1: C164C.1 C203C.2 R48C.1 R57C.1 | length 10.4
  L1 w0.298: R57C.1@46.39,41.415 47.117,41.415 47.419,41.113 51.844,41.113 52.144,40.813 52.144,38.813 51.494,38.163 50.944,38.163 R48C.1@50.031,38.163
NetC164D_1: C164D.1 C203D.2 R48D.1 R57D.1 | length 9.9
  L1 w0.298: R57D.1@46.39,24.415 51.108,24.415 51.86,23.663 51.86,21.566 51.456,21.163 R48D.1@50.031,21.163
NetC170_1: C170.1 IC20.3 R193.2 | length 4.3
  L1 w0.127: IC20.3@33.994,7.61 35.334,7.61 35.574,7.85 C170.1@35.574,8.738
  L1 w0.152: IC20.3@33.994,7.61 33.994,6.42 34.169,6.245 34.189,6.245 34.403,6.031 R193.2@34.403,6.011
NetC172A_1: C172A.1 C204A.2 R48A.2 R49A.1 | length 2.2
  L1 w0.298: R49A.1@46.931,72.163 48.144,72.163 R48A.2@49.091,72.163
NetC172B_1: C172B.1 C204B.2 R48B.2 R49B.1 | length 2.2
  L1 w0.298: R49B.1@46.931,55.163 48.144,55.163 R48B.2@49.091,55.163
NetC172C_1: C172C.1 C204C.2 R48C.2 R49C.1 | length 2.2
  L1 w0.298: R49C.1@46.931,38.163 48.144,38.163 R48C.2@49.091,38.163
NetC172D_1: C172D.1 C204D.2 R48D.2 R49D.1 | length 2.2
  L1 w0.298: R49D.1@46.931,21.163 48.144,21.163 R48D.2@49.091,21.163
NetC174_1: C174.1 IC21.7 R133.2 | length 6.1
  L1 w0.152: IC21.7@27.369,11.815 27.369,12.497 27.402,12.53 27.402,12.728 28.226,13.552 C174.1@28.424,13.552 28.312,13.663 28.312,14.799 28.401,14.888 28.905,14.888 29.092,15.075 29.949,15.075 30.223,15.348 R133.2@30.649,15.348
NetC176A_1: C176A.1 C205A.2 R49A.2 R50A.1 | length 2.3
  L1 w0.298: R50A.1@43.715,72.163 44.894,72.163 R49A.2@45.991,72.163
NetC176B_1: C176B.1 C205B.2 R49B.2 R50B.1 | length 2.3
  L1 w0.298: R50B.1@43.715,55.163 44.894,55.163 R49B.2@45.991,55.163
NetC176C_1: C176C.1 C205C.2 R49C.2 R50C.1 | length 2.3
  L1 w0.298: R50C.1@43.715,38.163 44.894,38.163 R49C.2@45.991,38.163
NetC176D_1: C176D.1 C205D.2 R49D.2 R50D.1 | length 2.3
  L1 w0.298: R50D.1@43.715,21.163 44.894,21.163 R49D.2@45.991,21.163
NetC180A_1: C180A.1 C206A.2 R50A.2 R51A.2 | length 1.9
  L1 w0.298: R51A.2@40.864,72.138 40.889,72.163 41.769,72.163 R50A.2@42.775,72.163
NetC180B_1: C180B.1 C206B.2 R50B.2 R51B.2 | length 1.9
  L1 w0.298: R51B.2@40.864,55.138 40.889,55.163 41.769,55.163 R50B.2@42.775,55.163
NetC180C_1: C180C.1 C206C.2 R50C.2 R51C.2 | length 1.9
  L1 w0.298: R51C.2@40.864,38.138 40.889,38.163 41.769,38.163 R50C.2@42.775,38.163
NetC180D_1: C180D.1 C206D.2 R50D.2 R51D.2 | length 1.9
  L1 w0.298: R51D.2@40.864,21.138 40.889,21.163 41.769,21.163 R50D.2@42.775,21.163
NetC190_2: C190.2 R73.1 TR3.3 | length 7.3
  L1 w0.298: R73.1@146.687,60.185 147.282,60.185 147.832,59.635 TR3.3@148.277,59.635 148.722,59.635 149.564,60.476 149.564,62.816 150.261,63.513 C190.2@150.771,63.513
NetC196_2: C196.2 R46.1 TR2.3 | length 5.5
  L1 w0.298: C196.2@10.144,12.988 10.694,12.988 11.061,12.621 11.061,10.707 TR2.3@11.214,10.553 11.214,9.194 10.983,8.963 R46.1@10.414,8.963
NetC202A_1: C202A.1 C207A.2 R51A.1 R58A.1 | length 4.9
  L1 w0.298: R58A.1@37.474,74.813 37.474,72.583 37.919,72.138 38.944,72.138 R51A.1@39.924,72.138
NetC202B_1: C202B.1 C207B.2 R51B.1 R58B.1 | length 4.9
  L1 w0.298: R58B.1@37.474,57.813 37.474,55.583 37.919,55.138 38.944,55.138 R51B.1@39.924,55.138
NetC202C_1: C202C.1 C207C.2 R51C.1 R58C.1 | length 4.9
  L1 w0.298: R58C.1@37.474,40.813 37.474,38.583 37.919,38.138 38.944,38.138 R51C.1@39.924,38.138
NetC202D_1: C202D.1 C207D.2 R51D.1 R58D.1 | length 4.9
  L1 w0.298: R58D.1@37.474,23.813 37.474,21.583 37.919,21.138 38.944,21.138 R51D.1@39.924,21.138
NetC216_2: C216.2 IC27.6 | length 3
  L6 w0.254: C216.2@117.09,0.523 117.09,-0.203 117.831,-0.944 118.197,-0.944 118.449,-0.691 IC27.6@118.998,-0.691
NetFL2A_1: FL2A.1 R59A.2 | length 1.9
  L1 w0.298: FL2A.1@43.644,76.538 43.751,76.431 R59A.2@45.45,76.431
NetFL2B_1: FL2B.1 R59B.2 | length 1.9
  L1 w0.298: FL2B.1@43.644,59.538 43.751,59.431 R59B.2@45.45,59.431
NetFL2C_1: FL2C.1 R59C.2 | length 1.9
  L1 w0.298: FL2C.1@43.644,42.538 43.751,42.431 R59C.2@45.45,42.431
NetFL2D_1: FL2D.1 R59D.2 | length 1.9
  L1 w0.298: FL2D.1@43.644,25.538 43.751,25.431 R59D.2@45.45,25.431
NetIC2A_80: IC2A.80 R56A.1 | length 3
  L1 w0.127: R56A.1@61.764,81.638 61.861,81.541 IC2A.80@64.744,81.541
NetIC2A_81: IC2A.81 R78A.1 | length 3.3
  L1 w0.127: R78A.1@61.764,80.638 R78A.1@61.764,80.788 61.764,80.958 61.847,81.041 IC2A.81@64.744,81.041
NetIC2A_95: IC2A.95 R88A.2 | length 1.6
  L1 w0.203: R88A.2@63.234,73.738 63.509,74.013 64.716,74.013 IC2A.95@64.744,74.041
NetIC2B_80: IC2B.80 R56B.1 | length 3
  L1 w0.127: R56B.1@61.764,59.138 61.861,59.041 IC2B.80@64.744,59.041
NetIC2B_81: IC2B.81 R78B.1 | length 3.3
  L1 w0.127: R78B.1@61.764,58.138 R78B.1@61.764,58.288 61.764,58.458 61.847,58.541 IC2B.81@64.744,58.541
NetIC2B_95: IC2B.95 R88B.2 | length 1.6
  L1 w0.203: R88B.2@63.234,51.238 63.509,51.513 64.716,51.513 IC2B.95@64.744,51.541
NetIC2C_80: IC2C.80 R56C.1 | length 3
  L1 w0.127: R56C.1@61.764,36.638 61.861,36.541 IC2C.80@64.744,36.541
NetIC2C_81: IC2C.81 R78C.1 | length 3.3
  L1 w0.127: R78C.1@61.764,35.638 R78C.1@61.764,35.788 61.764,35.958 61.847,36.041 IC2C.81@64.744,36.041
NetIC2C_95: IC2C.95 R88C.2 | length 1.6
  L1 w0.203: R88C.2@63.234,28.738 63.509,29.013 64.716,29.013 IC2C.95@64.744,29.041
NetIC2D_80: IC2D.80 R56D.1 | length 3
  L1 w0.127: R56D.1@61.764,14.138 61.861,14.041 IC2D.80@64.744,14.041
NetIC2D_81: IC2D.81 R78D.1 | length 3.3
  L1 w0.127: R78D.1@61.764,13.138 R78D.1@61.764,13.288 61.764,13.458 61.847,13.541 IC2D.81@64.744,13.541
NetIC2D_95: IC2D.95 R88D.2 | length 1.6
  L1 w0.203: R88D.2@63.234,6.238 63.509,6.513 64.716,6.513 IC2D.95@64.744,6.541
NetIC4_8: IC4.8 R31.1 R32.2 | length 3.8
  L6 w0.152: R31.1@121.308,50.162 R32.2@122.408,50.162 122.408,49.532 122.777,49.163 123.546,49.163 123.626,49.082 IC4.8@124.258,49.082
NetIC7_16: IC7.16 R23.1 R80.2 | length 3.2
  L1 w0.152: R80.2@106.994,10.738 R23.1@108.494,10.738 109.194,10.738 109.585,10.347 IC7.16@110.081,10.347
NetIC9_8: IC9.8 R152.2 | length 54.6
  L1 w0.127: v1(130.991,60.368) R152.2@130.991,61.798 ; IC9.8@142.491,18.605 142.912,18.605 v1(142.954,18.562)
  L3 w0.127: v1(130.991,60.368) 134.444,56.915 134.444,20.117 134.844,19.717 v1(134.844,17.741)
  L4 w0.127: v1(134.844,17.741) 139.183,17.741 139.521,18.079 142.471,18.079 v1(142.954,18.562)
NetIC9_24: IC9.24 R153.2 | length 63
  L1 w0.152: R153.2@127.518,60.239 128.307,59.45 131.775,59.45 v1(132.292,59.968) ; v1(138.944,23.083) 138.944,23.758 IC9.24@138.991,23.805
  L3 w0.152: v1(145.376,58.541) 145.376,54.674 146.472,53.579 146.472,52.768 146.764,52.475 146.764,52.148 146.24,51.624 146.036,51.624 145.6,51.188 145.6,47.457 145.667,47.391 145.667,35.561 145.494,35.388 145.494,25.299 v1(145.881,24.912)
  L4 w0.152: v1(132.292,59.968) 136.294,59.968 136.358,59.904 138.644,59.904 139.239,60.5 143.418,60.5 v1(145.376,58.541) ; v1(138.944,23.083) 139.731,23.871 143.78,23.871 144.267,24.358 145.327,24.358 v1(145.881,24.912)
NetIC11_16: IC11.16 R118.1 R119.2 | length 4.3
  L1 w0.152: R119.2@118.494,13.438 R118.1@119.994,13.438 121.244,13.438 121.831,12.851 IC11.16@121.831,12.18
NetIC12_1: IC12.1 R121.1 R124.2 | length 4.5
  L6 w0.127: IC12.1@105.588,75.605 105.588,74.176 105.577,74.164 R124.2@106.008,73.733
  L6 w0.152: R124.2@106.008,73.733 106.716,73.733 106.785,73.802 106.785,74.442 107.126,74.783 R121.1@107.674,74.783
NetIC12_2: IC12.2 R122.1 R125.2 | length 5.8
  L6 w0.127: R125.2@104.758,73.733 104.938,73.913 IC12.2@104.938,75.605 104.938,76.784 105.045,76.891 105.934,76.891 106.544,76.281 107.319,76.281
NetIC12_3: IC12.3 LD7.3 R123.1 | length 197.8
  L6 w0.127: LD7.3@4.074,5.488 4.074,7.268 5.453,8.648 5.453,18.513 5.473,18.532 5.473,18.897 5.319,19.05 5.319,23.97 5.024,24.266 5.024,25.907 5.473,26.356 5.473,35.113 5.319,35.267 5.319,41.548 5.324,41.553 5.324,52.669 5.319,52.674 5.319,58.358 5.324,58.363 5.324,70.534 5.319,70.539 5.319,74.069 5.324,74.073 5.324,77.603 5.473,77.752 5.473,86.888 6.777,88.192 7.076,88.192 9.694,90.81 99.363,90.81 101.235,88.938 101.235,87.58 101.786,87.029 101.786,86.5 102.378,85.908 102.378,82.879 102.335,82.835 102.335,80.173 102.521,79.987 102.521,79.723 103.623,78.622 103.623,78.593 104.334,77.882 104.288,77.836 IC12.3@104.288,75.605 104.258,75.575 104.258,74.275 104.156,74.173 104.156,73.792 103.75,73.386 R123.1@103.737,73.386
NetIC12_5: IC12.5 R126.2 | length 2.3
  L6 w0.127: R126.2@102.835,81.526 102.835,80.066 102.896,80.005 IC12.5@103.638,80.005
NetIC12_6: IC12.6 R127.2 | length 1.6
  L6 w0.127: R127.2@104.131,81.577 104.288,81.42 IC12.6@104.288,80.005
NetIC12_7: IC12.7 R128.2 | length 1.6
  L6 w0.127: IC12.7@104.938,80.005 104.938,81.42 R128.2@105.096,81.577
NetIC13A_32: IC13A.32 R93A.1 R94A.2 | length 7.3
  L1 w0.203: IC13A.32@94.834,73.091 95.68,73.091 96.252,73.663 98.419,73.663 98.726,73.971 v1(98.726,74.071)
  L6 w0.17: v1(98.726,74.071) 99.401,74.071 99.734,74.403 R93A.1@99.734,74.86 99.734,75.038 R94A.2@100.894,75.038
NetIC13B_32: IC13B.32 R93B.1 R94B.2 | length 7.3
  L1 w0.203: IC13B.32@94.834,50.591 95.459,50.591 95.755,50.887 95.976,50.887 96.252,51.163 98.419,51.163 98.726,51.471 v1(98.726,51.571)
  L6 w0.17: v1(98.726,51.571) 99.401,51.571 99.734,51.903 R93B.1@99.734,52.36 99.734,52.538 R94B.2@100.894,52.538
NetIC13C_32: IC13C.32 R93C.1 R94C.2 | length 7.3
  L1 w0.203: IC13C.32@94.834,28.091 95.459,28.091 95.755,28.387 95.976,28.387 96.252,28.663 98.419,28.663 98.726,28.971 v1(98.726,29.071)
  L6 w0.17: v1(98.726,29.071) 99.401,29.071 99.734,29.403 R93C.1@99.734,29.86 99.734,30.038 R94C.2@100.894,30.038
NetIC13D_32: IC13D.32 R93D.1 R94D.2 | length 7.3
  L1 w0.203: IC13D.32@94.834,5.591 95.459,5.591 95.755,5.887 95.976,5.887 96.252,6.163 98.419,6.163 98.726,6.471 v1(98.726,6.577)
  L6 w0.17: v1(98.726,6.577) 99.395,6.577 99.401,6.571 99.734,6.903 R93D.1@99.734,7.36 99.734,7.538 R94D.2@100.894,7.538
NetIC15_A4: IC15.A4 R84.1 | length 1.9
  L1 w0.152: IC15.A4@144.952,6.485 144.952,7.765 R84.1@145.382,8.195
NetIC15_A5: IC15.A5 TP8.1 | length 4.5
  L1 w0.152: IC15.A5@146.222,6.485 146.821,7.084 v1(146.82,7.153) ; v1@149.11,7.238 v1(149.11,7.213) 150.168,7.213 TP8.1@150.327,7.372
  L6 w0.152: v1(146.82,7.153) 146.85,7.183 149.08,7.183 v1(149.11,7.213)
NetIC15_B2: IC15.B2 IC15.D2 R120.2 R123.2 | length 131.1
  L1 w0.127: v1(141.821,2.153) 141.89,2.153 IC15.D2@142.412,2.675 ; v1(141.821,4.624) IC15.B2@142.412,5.215
  L3 w0.127: v1(109.084,73.208) 108.982,73.208 108.906,73.284 108.601,72.979 108.601,61.714 108.991,61.324 108.991,54.489 108.844,54.342 108.844,52.105 108.757,52.019 108.757,51.484 108.844,51.397 108.844,50.109 109.16,49.793 v1(109.16,49.789) ; v1(110.074,41.179) 110.074,40.04 109.946,39.911 109.946,28.333 109.828,28.214 109.828,26.586 109.634,26.391 109.634,22.544 110.125,22.052 110.125,18.649 110.074,18.598 110.074,17.943 110.715,17.303 110.715,7.256 v1(112.223,5.749) ; v1(135.444,0.264) 135.817,-0.108 142.918,-0.108 143.385,0.358 143.385,1.75 142.535,2.599 ; v1(141.821,2.153) 141.87,2.203 142.14,2.203 142.535,2.599 ; v1(141.821,4.624) 142.535,3.909 142.535,2.599
  L4 w0.127: v1@108.881,73.183 109.058,73.183 v1(109.084,73.208) ; v1(109.16,49.789) 109.16,49.688 109.516,49.332 113.681,49.332 116.384,46.629 116.384,42.739 115.942,42.296 115.875,42.296 115.443,41.864 110.76,41.864 v1(110.074,41.179) ; v1(112.223,5.749) 112.663,5.308 113.94,5.308 114.071,5.439 115.67,5.439 115.938,5.171 118.904,5.171 120.37,6.637 126.322,6.637 127.495,5.464 129.594,5.464 129.973,5.086 130.628,5.086 135.444,0.27 v1(135.444,0.264) ; v1(141.821,4.624) v1@141.821,4.653
  L6 w0.127: R123.2@102.797,73.386 103.186,72.997 103.257,72.997 103.564,72.689 103.797,72.689 105.141,71.345 106.561,71.345 107.56,72.344 108.22,72.344 v1(109.084,73.208)
NetIC15_C3: IC15.C3 TP5.1 | length 13.4
  L1 w0.127: IC15.C3@143.682,3.945 144.14,4.403 v1(144.071,4.473) ; TP5.1@153.194,5.961 154.029,5.961 154.035,5.956 154.174,5.956 v1(154.245,5.884)
  L3 w0.127: v1(144.071,4.473) 144.071,5.026 145.388,6.344 153.786,6.344 v1(154.245,5.884)
  L6 w0.127: v1@144.071,4.403 v1(144.071,4.473)
NetIC15_C4: IC15.C4 TP6.1 | length 12.9
  L1 w0.127: IC15.C4@144.952,3.945 144.952,4.013 145.37,4.431 v1(145.37,4.447) ; TP6.1@152.604,8.011 153.134,8.541 v1(153.944,8.541)
  L6 w0.127: v1(145.37,4.447) 145.37,4.354 145.681,4.043 148.606,4.043 153.104,8.541 v1(153.944,8.541)
NetIC15_E4: IC15.E4 R55.1 R82.1 | length 5
  L1 w0.152: IC15.E4@144.952,1.405 145.571,0.787 145.571,0.007 R55.1@145.882,-0.305 145.882,-0.285 146.51,0.342 146.629,0.342 146.654,0.367 146.758,0.367 147.024,0.633 147.024,0.737 R82.1@147.932,1.645
NetIC15_E5: IC15.E5 TP7.1 | length 7.8
  L1 w0.127: IC15.E5@146.222,1.405 146.222,1.23 146.601,0.851 v1(146.571,0.82) ; v1(148.879,1.631) 148.879,2.172 150.444,3.737 TP7.1@150.444,5.403
  L6 w0.127: v1(146.571,0.82) 147.404,1.653 v1@148.879,1.653
NetIC18_16: IC18.16 R129.1 R130.2 | length 4.2
  L1 w0.152: IC18.16@110.594,84.988 110.594,86.288 R130.2@110.244,86.638 110.244,86.688 111.844,88.288 R129.1@111.844,88.388
NetIC19_1: IC19.1 IC19.33 R155.2 | length 19.5
  L1 w0.152: v1(106.959,45.922) 107.153,45.922 107.444,46.213 IC19.1@107.744,46.213 ; IC19.33@114.744,46.213 115.725,46.213 115.756,46.244 117.328,46.244 117.758,46.673 117.758,48.914 117.259,49.413 115.366,49.413 v1@115.084,49.13
  L4 w0.152: v1(106.959,45.922) 107.651,46.614 113.553,46.614 114.083,47.143 114.781,47.143 115.075,46.849 115.075,46.594 v1(115.436,46.233)
  L6 w0.152: v1(114.854,49.064) 114.856,49.062 R155.2@115.492,49.062
NetIC19_2: IC19.2 IC19.3 IC19.31 IC19.32 R141.2 | length 17.3
  L1 w0.2: IC19.3@107.744,45.213 108.302,45.213 ; IC19.2@107.744,45.713 108.302,45.713 ; IC19.31@114.744,45.213 115.302,45.213 115.302,45.683 115.272,45.713 ; IC19.32@114.744,45.713 115.272,45.713 ; 115.302,45.713 115.272,45.713
  L1 w0.211: 108.302,45.213 109.615,45.213 109.88,45.478 ; 108.302,45.713 109.645,45.713 109.88,45.478 ; IC19.31@114.744,45.213 114.505,45.213 114.5,45.208 114.5,45.175 114.37,45.046 114.356,45.046 114.161,44.851 114.161,44.631 113.782,44.251 113.293,44.251 113.03,44.514 113.03,45.478 ; R141.2@116.665,47.051 116.355,47.361 114.582,47.361 114.077,46.856 114.077,46.825 113.882,46.631 113.851,46.631 113.03,45.81 113.03,45.478 ; 109.88,45.478 113.03,45.478
NetIC19_16: IC19.16 R103.2 R108.1 | length 9.6
  L1 w0.152: v1(110.722,39.669) 110.744,39.692 IC19.16@110.744,40.213 110.744,40.712 111.355,41.323 113.707,41.323 114.12,40.91 114.494,40.91 115.804,39.601 R108.1@115.804,38.363 115.804,37.206 R103.2@115.865,37.145
NetIC19_18: IC19.18 R109.2 R110.1 | length 10.7
  L1 w0.152: IC19.18@111.744,40.213 111.744,40.771 112.016,41.044 113.592,41.044 114.005,40.631 114.312,40.631 114.578,40.365 114.578,39.945 114.112,39.478 114.112,37.014 115.337,35.788 R109.2@115.865,35.788 115.865,34.732 R110.1@115.804,34.671
NetIC19_23: IC19.23 R154.2 | length 2.7
  L1 w0.152: IC19.23@114.744,41.213 115.06,41.213 115.537,40.736 115.537,40.593 115.851,40.279 116.264,40.279 R154.2@116.734,39.809
NetIC20_4: IC20.4 R131.1 R132.2 | length 3
  L1 w0.127: R131.1@32.624,11.938 R132.2@34.024,11.938 33.994,11.908 IC20.4@33.994,10.31
NetIC21_6: IC21.6 R176.2 R177.1 | length 4.2
  L1 w0.152: IC21.6@27.869,11.815 27.871,11.813 28.598,11.813 v1(28.973,11.438)
  L6 w0.152: R177.1@28.514,13.838 28.514,13.218 R176.2@29.394,12.338 29.02,11.964 29.02,11.486 v1(28.973,11.438)
NetIC22_5: IC22.5 R134.1 R136.2 | length 3.9
  L1 w0.254: IC22.5@126.194,3.241 126.194,4.252 v1(126.531,4.589)
  L6 w0.254: R134.1@124.181,4.656 125.764,4.656 R136.2@125.806,4.614 125.831,4.589 v1(126.531,4.589)
NetIC22_10: IC22.10 R166.1 | length 2
  L1 w0.254: IC22.10@126.194,0.341 126.203,0.332 126.203,-0.212 126.444,-0.453 v1(126.444,-0.459)
  L6 w0.127: v1(126.444,-0.459) 126.744,-0.759 R166.1@126.744,-1.459
NetIC23A_5: IC23A.5 R138A.2 | length 1
  L1 w0.3: IC23A.5@12.698,77.199 12.698,78.072 R138A.2@12.794,78.168